# EAGLE board part2a-monostable (EAGLE 9.7.0)

Size 192.75 x 67.94 mm. Coordinates in mm from the lower left corner, seen from the top.
Outline: 0,0 192.75,0 192.75,67.94 0,67.94 0,0
Copper layers (1*16): Top 0.035mm / dielectric 1.5mm / Bottom 0.035mm
Design rules "default": minimum track width 6mil, minimum drill 0.35mm, track to track 6mil, track to pad 6mil, pad to pad 6mil, via to via 6mil, smd to smd 6mil, copper to edge 40mil, drill to drill 6mil, minimum pad ring 10mil, minimum via ring 8mil, stop-mask expansion 4mil, vias tented up to drill 0mil, thermal gap 10mil

## Footprints (pad centres in the part's own frame; a part is rotated, then mirrored left to right if it is on the bottom)
CAP-THRU-2.54MM = drill 1.016 pad 1.88: 1 -1.27,0; 2 1.27,0
LEDRD254W60D565H860B_Y = drill 0.981 pad 1.581: 1 -1.27,0; 2 1.27,0
BATTERY-GENERIC = drill 1.118 pad 3.15 octagon: + 2.54,0; - -2.54,0
RESAD1016W63L850D250B = drill 0.83 pad 1.43: 1 -5.08,0; 2 5.08,0
SWITCH-MOMENTARY-PTH-6.5MM = drill 1.016 pad 1.88: 1 -3.251,2.261; 2 3.251,2.261; 3 -3.251,-2.261; 4 3.251,-2.261
DIP826W53P254L959H508Q8B = drill 0.786 pad 1.386: 1 -4.13,3.81; 2 -4.13,1.27; 3 -4.13,-1.27; 4 -4.13,-3.81; 5 4.13,-3.81; 6 4.13,-1.27; 7 4.13,1.27; 8 4.13,3.81

## Placement (x,y rotation side)
C2  0.1u  [CAP-THRU-2.54MM]  44.55,51.44 270 top
C4  0.1u  [CAP-THRU-2.54MM]  186.79,5.71 270 top
C5  0.1u  [CAP-THRU-2.54MM]  106.78,40.01 0 top
C6  100n  [CAP-THRU-2.54MM]  119.48,40.01 0 top
D2  YELLOW  [LEDRD254W60D565H860B_Y]  104.24,24.77 180 top
P1  BATTERYGENERIC  [BATTERY-GENERIC]  8.26,59.68 180 top
R4  1k  [RESAD1016W63L850D250B]  95.35,9.53 90 top
R5  220  [RESAD1016W63L850D250B]  102.97,12.06 90 top
R6  1M  [RESAD1016W63L850D250B]  113.13,45.09 90 top
S1  SWITCH_MOMENTARY  [SWITCH-MOMENTARY-PTH-6.5MM]  92.81,28.57 90 top
U1  LM555_DIP  [DIP826W53P254L959H508Q8B]  114.4,28.57 90 top

## Library data of the parts
C2 C4-C6 P1 R4-R6 S1 = Tinkercad
D2 = Tinkercad; CATEGORY: Opto-Electronic; SUB-CATEGORY: LED; VALUE: LED_YELLOW
U1 = Tinkercad; CATEGORY: IC_Clock-Timing; CURRENT-SUPPLY: 10mA; DESCRIPTION: IC OSC SINGLE TIMER 100KHZ 8-DIP; FREQUENCY: 100kHz; MANUFACTURER: Texas Instruments; MPN: LM555CN/NOPB; OPERATING_TEMP: 0°C to 70°C; PART_STATUS: Active; ROHS_COMPLIANT: ROHS3 Compliant; SUB-CATEGORY: Timer

## Nets
D2_C: D2.2 R5.2
P1+: C2.2 C4.2 P1.+ R4.1 R6.2 U1.4 U1.8
P1-: C2.1 C4.1 C5.1 C6.2 P1.- R5.1 S1.1 S1.2 U1.1
U1_CV: C6.1 U1.5
U1_DIS: C5.2 R6.1 U1.6 U1.7
U1_OUT: D2.1 U1.3
U1_TR: R4.2 S1.3 S1.4 U1.2

## Tracks (layer width: path | path; a pad name or v marks a point on that pad's centre or on a via)
D2_C  (1 unrouted)
P1+  (6 unrouted)
P1-  (8 unrouted)
U1_CV  (1 unrouted)
U1_DIS  (3 unrouted)
U1_OUT  (1 unrouted)
U1_TR  (3 unrouted)